# Altium PCB AD.PcbDoc
Units mm, origin at the board's own origin, x right, y up, seen from the top; angles counter-clockwise.
Board outline 75 x 75 mm, 2 copper layers (Top Layer, Bottom Layer); 9 components, 16 nets, 117 pads, 0 vias.
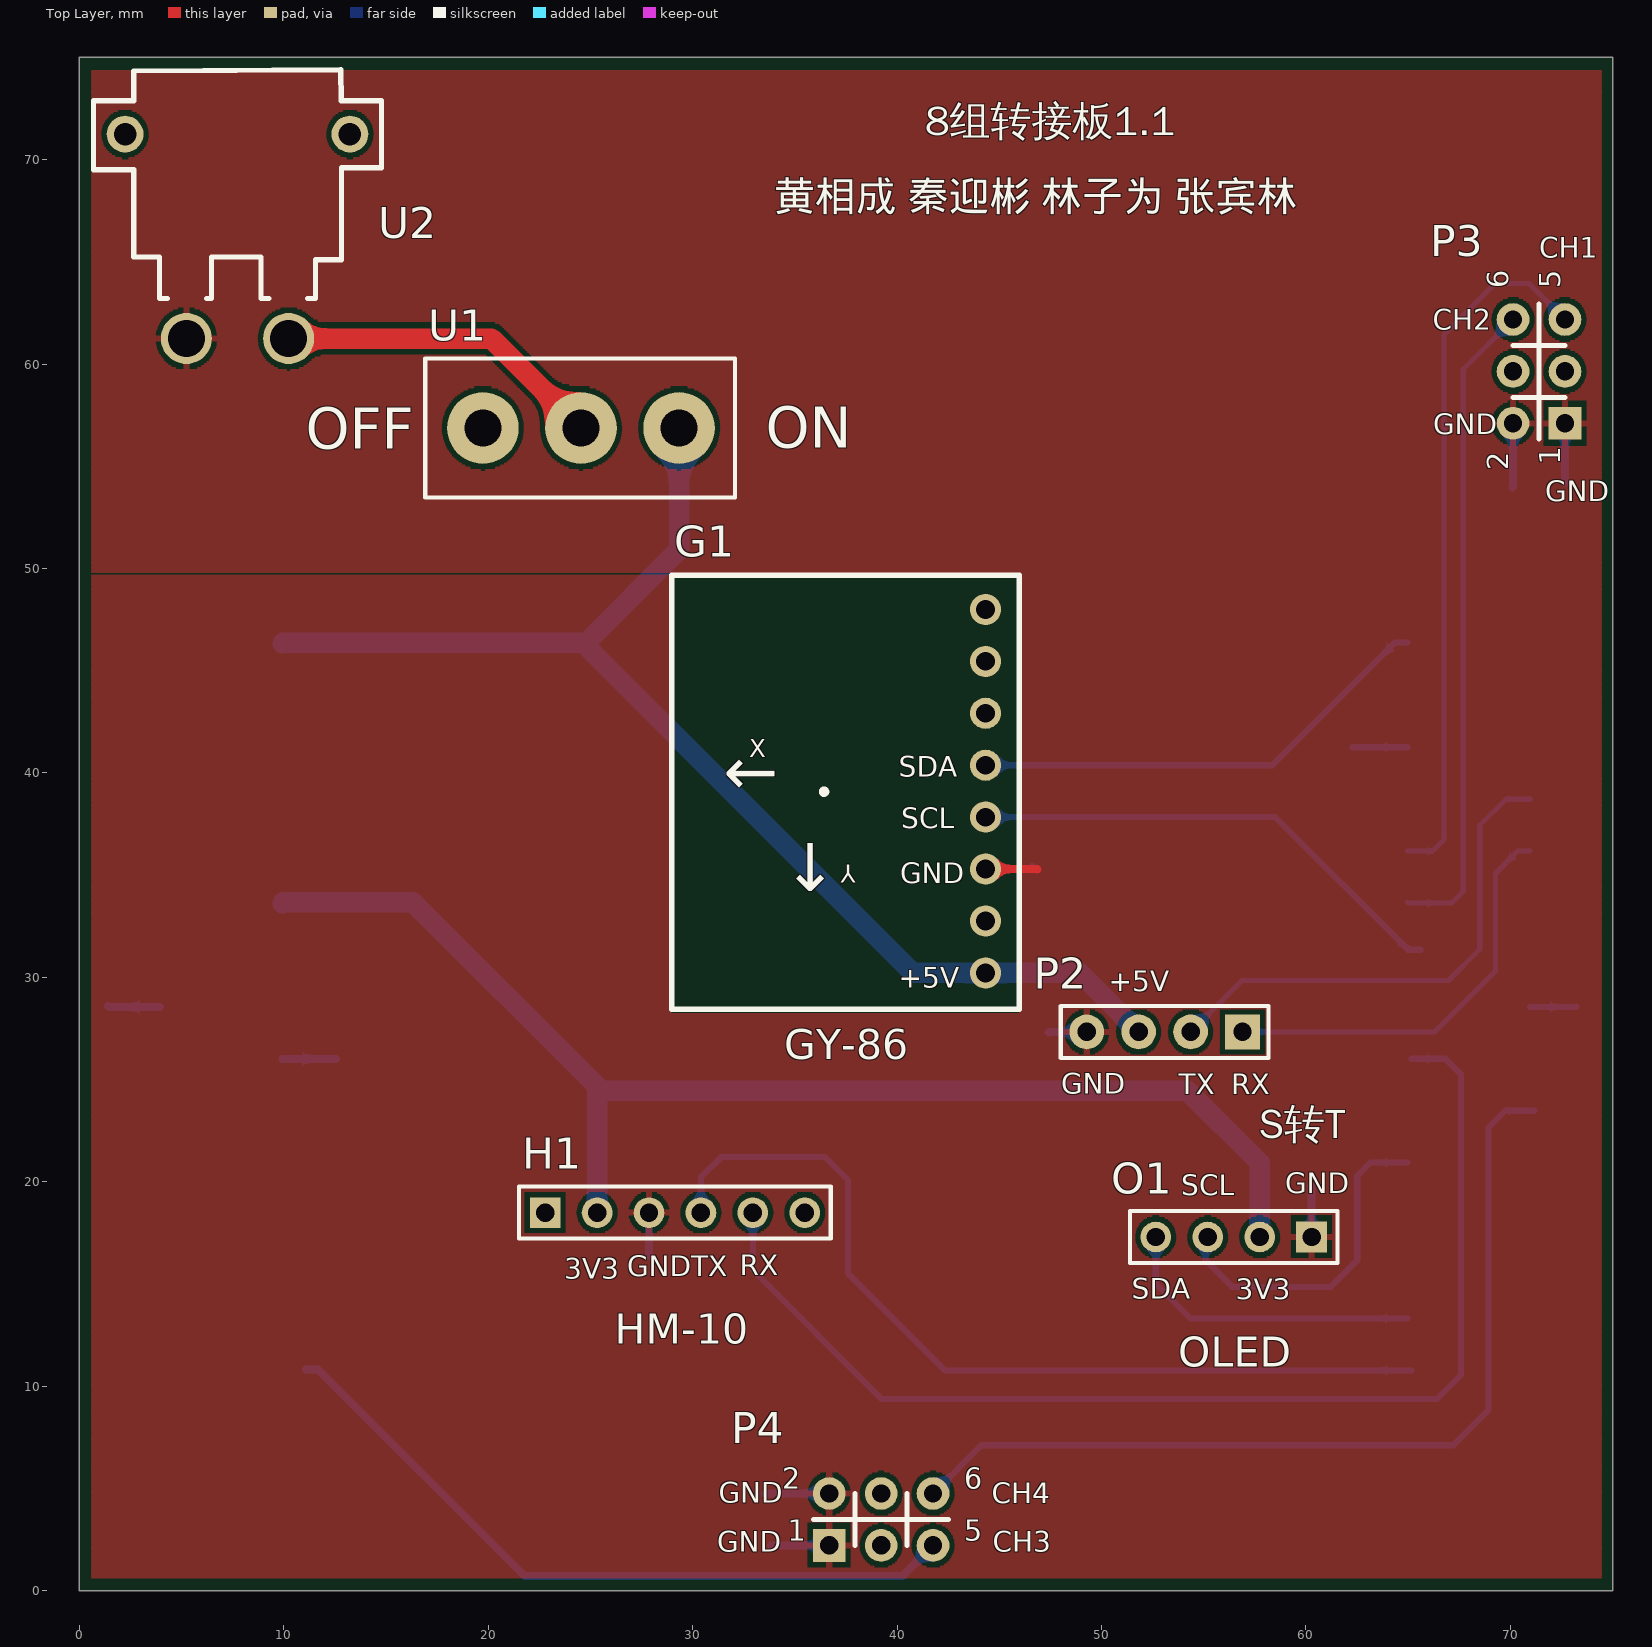
[diagram p0: Top Layer view]
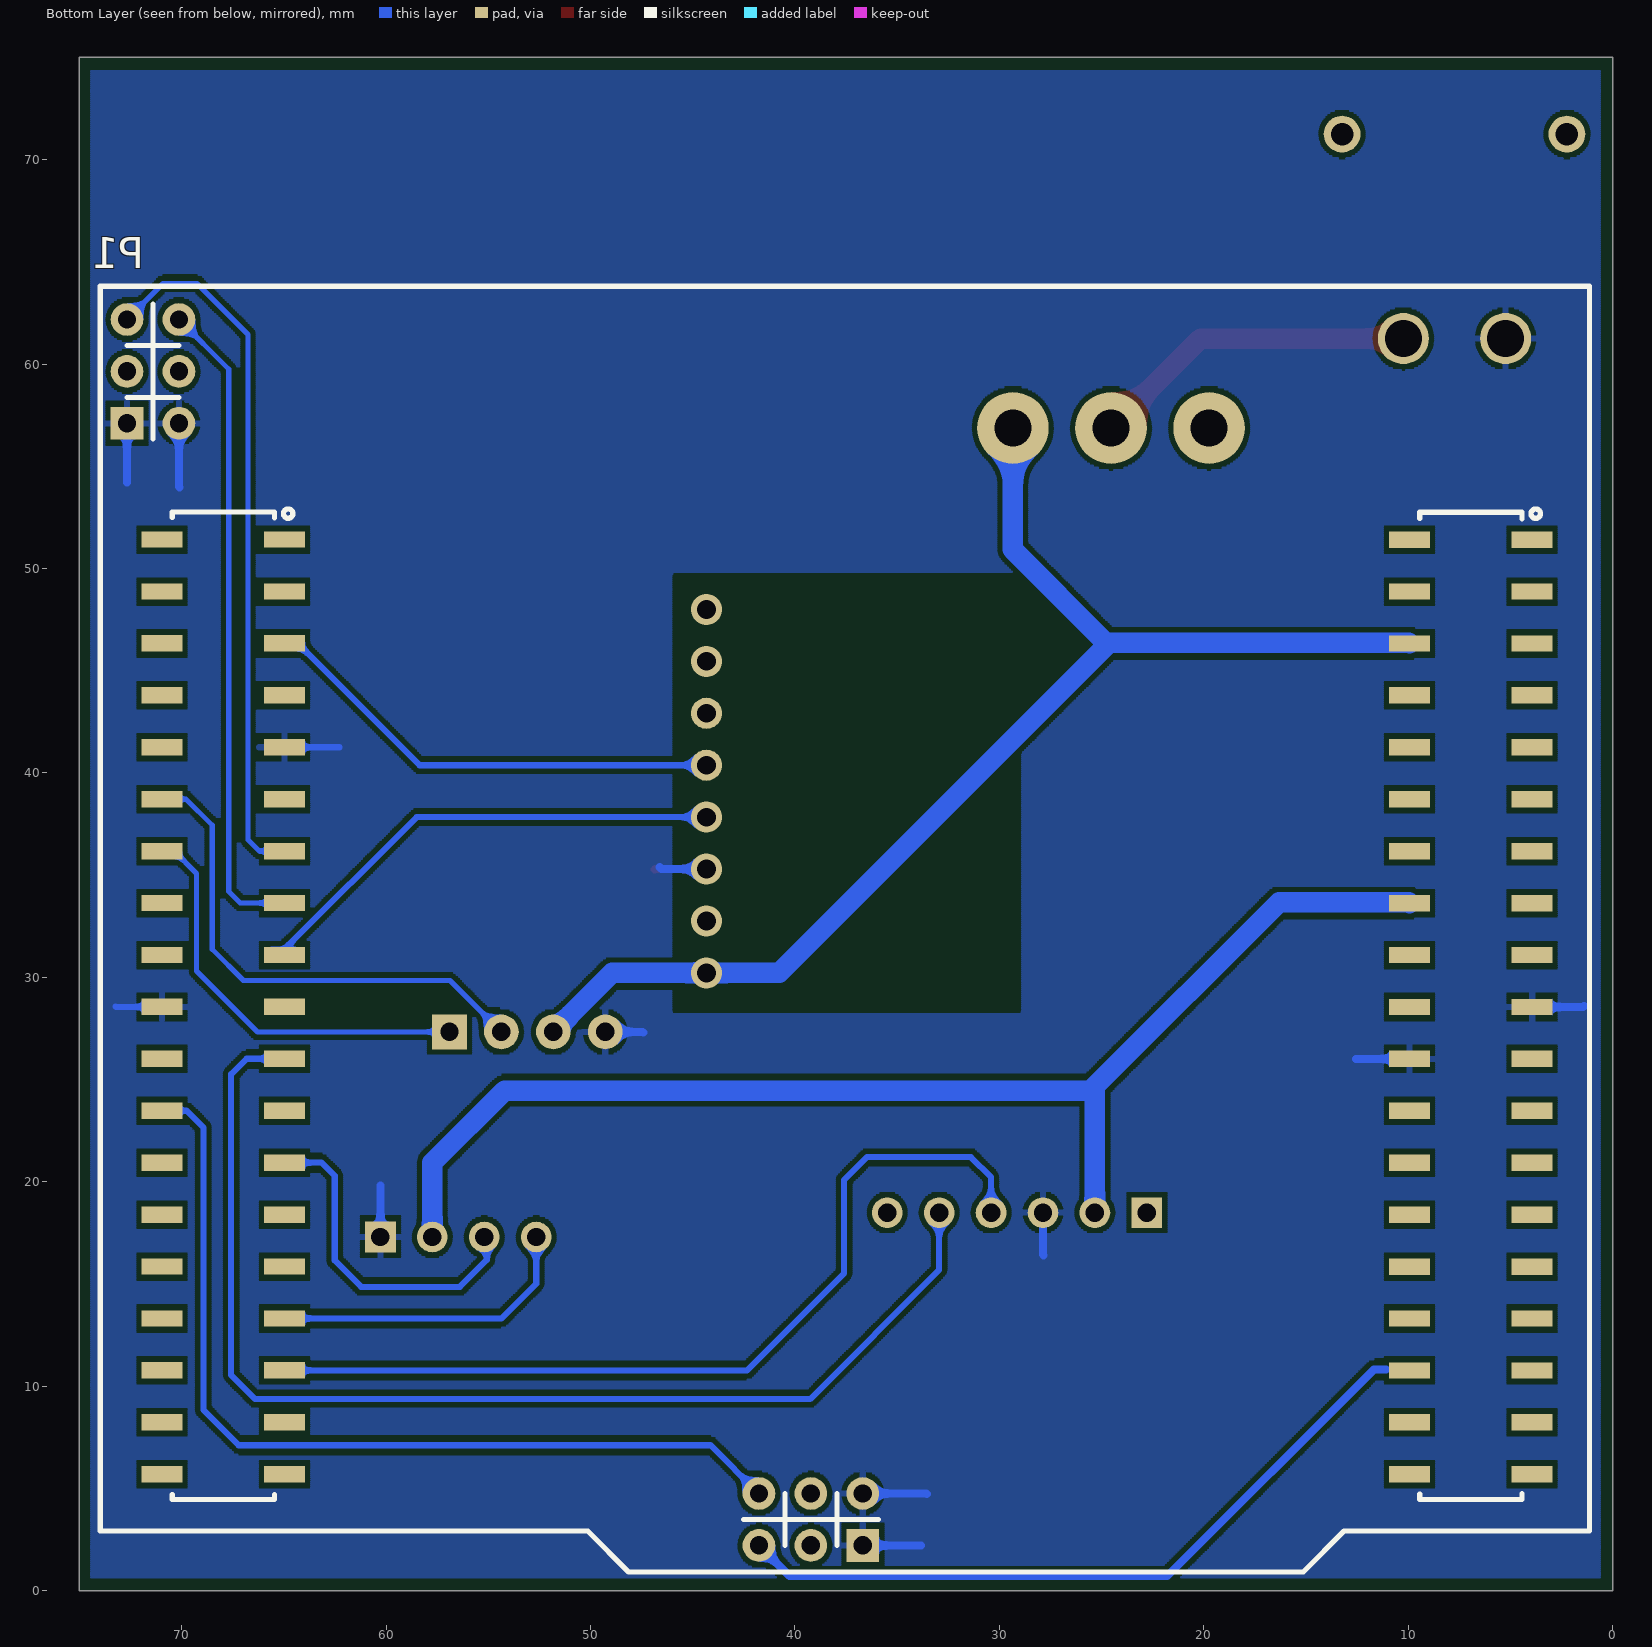
[diagram p1: Bottom Layer view, seen from below]

## Layer stack, top to bottom
Top Solder: solder mask 0.0102, Solder Resist, Dk 3.5
Top Layer: signal copper 0.0356
Dielectric 1: dielectric 0.32, FR-4, Dk 4.8
Bottom Layer: signal copper 0.0356
Bottom Solder: solder mask 0.0102, Solder Resist, Dk 3.5

## Board outline
0,0 0,75 75,75 75,0

## Design rules (kind name [scope] priority, off if disabled: settings)
Clearance GND_Polygon_Clearance [InNet('GND')] p1: gap=0.25 ignorepadtopadclearanceinfootprint=FALSE
Clearance [All] p2: gap=0.3 ignorepadtopadclearanceinfootprint=FALSE
PolygonConnect PolygonGND [InNet('GND')] p1: connectstyle=Relief reliefconductorwidth=0.3 reliefentries=4 polygonreliefangle="90 Angle" airgapwidth=0.25
PolygonConnect [All] p2: connectstyle=Relief reliefconductorwidth=0.254 reliefentries=4 polygonreliefangle="90 Angle" airgapwidth=0.254
RoutingVias [All] p1: holewidth=0.305 width=0.61 viastyle="Through Hole" minholewidth=0.305 minwidth=0.61 maxholewidth=0.305 maxwidth=0.61
SolderMaskExpansion [All] p1: expansion=0.064 istentingtop=FALSE
SupplyNets "Schematic Supply Nets_2" [InNet('+3V3')] p1: voltage=0.000
SupplyNets "Schematic Supply Nets_1" [InNet('+5')] p2: voltage=0.000
SupplyNets "Schematic Supply Nets" [InNet('GND')] p3: voltage=0.000
Width Width_PWR [InNetClass('PWR')] p1: maxlimit=1.524 minlimit=0.305 preferedwidth=0.305
Width Width_INF [InNetClass('INF')] p2: maxlimit=0.4 minlimit=0.2 preferedwidth=0.2
Width Width_PWM [InNetClass('PWM')] p3: maxlimit=0.4 minlimit=0.2 preferedwidth=0.2
Width [All] p4: maxlimit=0.254 minlimit=0.254 preferedwidth=0.254
30 further rules are at their usual default settings.

## Classes and differential pairs
net class PWM: TIM3_CH1 TIM3_CH2 TIM3_CH3 TIM3_CH4
net class INF: I2C1_SCL I2C1_SDA I2C2_SCL I2C2_SDA USART1_RX USART1_TX USART6_RX USART6_TX
net class PWR: +3V3 +5 GND NetU1_2

## Components (designator, comment, footprint, x,y, rotation, side; value= is the part's Value field where it differs from the comment)
G1 "GY-86" GY-86 39.247,39.105 r180 top
H1 "HM-10" HDR1X6 22.784,18.491 r0 top
O1 "OLED" HDR1X4 60.274,17.297 r180 top
P1 "NUCLEO-64" NUCLEO-F103RB 73.979,63.775 r270 bottom
P2 "SBUS转TTL" HDR2.54-M-LI-4P 53.086,27.33 r180 top
P3 "PWM" HDR2.54-WI-2X3P 71.399,59.639 r90 top
P4 "PWM" HDR2.54-WI-2X3P 39.218,3.48 r0 top
U1 "SS12D06-开关" SS12D06开关 24.536,56.871 r90 top
U2 "XT30PW" XT-30PW 10.235,61.247 r180 top

## Footprints (in the part's own frame and the unit in brackets; to place one, negate y for a bottom-side part, rotate by r counter-clockwise, add the part's x,y. Pads: shape width x height; smd on the part's side, far side on the other; paste and mask are expansions set on the pad)
GY-86 [mil]
  round 60 hole 36: 1(-200,350) 2(-200,250) 3(-200,150) 4(-200,50) 5(-200,-50) 6(-200,-150) 7(-200,-250) 8(-200,-350)
  silkscreen extent -265,-416 404,420
HDR1X4 [mm] "Connector; Header; 4 Position"
  rect 1.5x1.5 hole 0.9: 1(0,0)
  round 1.5 hole 0.9: 2(2.54,0) 3(5.08,0) 4(7.62,0)
  silkscreen extent -1.27,-1.27 8.89,1.27
HDR1X6 [mm] "Connector; Header; 6 Position"
  rect 1.5x1.5 hole 0.9: 1(0,0)
  round 1.5 hole 0.9: 2(2.54,0) 3(5.08,0) 4(7.62,0) 5(10.16,0) 6(12.7,0)
  silkscreen extent -1.27,-1.27 13.97,1.27, body extent -1.27,-1.27 13.97,1.27, height 8.5
HDR2.54-M-LI-4P [mm] "排母，4脚"
  rect 1.7x1.7 hole 0.9: 1(-3.81,0)
  round 1.7 hole 0.9: 2(-1.27,0) 3(1.27,0) 4(3.81,0)
  silkscreen extent -5.08,-1.27 5.08,1.27, body extent -5.08,-1.27 5.08,1.27, height 8.5
HDR2.54-WI-2X3P [mm] "双排弯脚排针，3x2脚"
  rect 1.6x1.6 hole 0.9: 1(-2.54,-1.27)
  round 1.6 hole 0.9: 2(-2.54,1.27) 3(0,-1.27) 4(0,1.27) 5(2.54,-1.27) 6(2.54,1.27)
  silkscreen extent -3.3,-1.27 3.3,1.27, body extent -3.81,-10.49 3.81,2.36, height 5.1
NUCLEO-F103RB [mm]
  rect 0.8x2 smd paste+0 mask+0.051: 1(12.366,70.045) 2(12.366,64.045) 3(14.906,70.045) 4(14.906,64.045) 5(17.446,70.045) 6(17.446,64.045) 7(19.986,70.045) 8(19.986,64.045) 9(22.526,70.045) 10(22.526,64.045) 11(25.066,70.045) 12(25.066,64.045) 13(27.606,70.045) 14(27.606,64.045) 15(30.146,70.045) 16(30.146,64.045) 17(32.686,70.045) 18(32.686,64.045) 19(35.226,70.045) 20(35.226,64.045) 21(37.766,70.045) 22(37.766,64.045) 23(40.306,70.045) 24(40.306,64.045) 25(42.846,70.045) 26(42.846,64.045) 27(45.386,70.045) 28(45.386,64.045) 29(47.926,70.045) 30(47.926,64.045) 31(50.466,70.045) 32(50.466,64.045) 33(53.006,70.045) 34(53.006,64.045) 35(55.546,70.045) 36(55.546,64.045) 37(58.086,70.045) 38(58.086,64.045) 73(12.361,9.019) 74(12.361,3.019) 75(14.901,9.019) 76(14.901,3.019) 77(17.441,9.019) 78(17.441,3.019) 79(19.981,9.019) 80(19.981,3.019) 81(22.521,9.019) 82(22.521,3.019) 83(25.061,9.019) 84(25.061,3.019) 85(27.601,9.019) 86(27.601,3.019) 87(30.141,9.019) 88(30.141,3.019) 89(32.681,9.019) 90(32.681,3.019) 91(35.221,9.019) 92(35.221,3.019) 93(37.761,9.019) 94(37.761,3.019) 95(40.301,9.019) 96(40.301,3.019) 97(42.841,9.019) 98(42.841,3.019) 99(45.381,9.019) 100(45.381,3.019) 101(47.921,9.019) 102(47.921,3.019) 103(50.461,9.019) 104(50.461,3.019) 105(53.001,9.019) 106(53.001,3.019) 107(55.541,9.019) 108(55.541,3.019) 109(58.081,9.019) 110(58.081,3.019)
  silkscreen extent -0.03,0 62.87,72.84
SS12D06开关 [mm]
  round 3.5 hole 1.8 paste-2539.97 mask+0.102: 1(0,4.8) 2(0,0) 3(0,-4.8)
  silkscreen extent -3.4,-7.54 3.4,7.62
XT-30PW [mm]
  round 2.5 hole 1.8 paste-2539.97 mask+0.051: 1(5,0) 2(0,0)
  round 1.8 hole 1.1 paste-2539.97 mask+0.051: 3(8,-10) 4(-3,-10)
  silkscreen extent -4.55,-13.15 9.55,-1.95

## Part data
G1: "GY-86模块", AddInBom=yes, Device=GY-86, FootprintName=GY-86, Symbol=GY-86
H1: "HM-10蓝牙模块", LatestRevisionDate=17-Jul-2002, LatestRevisionNote="Re-released for DXP Platform.", Publisher="Altium Limited"
O1: "使用I2C通信的0.96寸OLED模块", LatestRevisionDate=17-Jul-2002, LatestRevisionNote="Re-released for DXP Platform.", Publisher="Altium Limited"
P1: "STM32F401NUCLEO开发板", Manufacturer=ST, AddInBom=yes, Device=NUCLEO-64, FootprintName=NUCLEO-F103RB, Supplier=Mouser, SupplierPart=NUCLEO-F103rb, Symbol=NUCLEO-64
P2: "SBUS转TTL模块", LatestRevisionDate=17-Jul-2002, LatestRevisionNote="Re-released for DXP Platform.", Publisher="Altium Limited"
P3 P4: "电机PWM输出", LatestRevisionDate=17-Jul-2002, LatestRevisionNote="Re-released for DXP Platform.", Publisher="Altium Limited"
U1: library part SS12D06, "SS12D06开关", AddInBom=yes, Device=SS12D06-开关, FootprintName=SS12D06开关, OriginFootprint=SS12D06开关, Symbol=SS12D06-开关
U2: "XT-30插头", AddInBom=yes, Device=XT30PW, FootprintName=XT-30PW, OriginFootprint=XT-30PW, Symbol=XT30PW

## Nets (pads, with @x,y where several pads share a name; then routed paths per layer and width w, separated by ;. In a path a pad name is that pad's centre, name@x,y a point inside that pad or via, vN(x,y) a via of type N, cw(c..) or ccw(c..) an arc to the next point about the centre after c; other vN are vias at no path point)
+3V3: H1.2 O1.2 P1.16 | length 62.9
  Bottom Layer w1: P1.16 9.98,33.676 16.312,33.676 25.324,24.663 ; H1.2 25.324,24.663 ; O1.2 57.734,20.93 54.204,24.46 25.527,24.46 25.324,24.663
+5: G1.1 P1.6 P2.3 U1.3 | length 62.2
  Bottom Layer w1: P1.6 9.98,46.376 24.786,46.376 29.336,50.926 U1.3 ; 24.697,46.287 40.768,30.215 G1.1 48.931,30.215 P2.3
GND: G1.3 H1.3 O1.1 P1.19 P1.22 P1.81 P1.92 P2.4 P3.1 P3.2 P4.1 P4.2 U2.1 | length 33.5
  Top Layer w0.4: G1.3 46.848,35.295 46.863,35.281
  Bottom Layer w0.305: 62.281,41.25 62.286,41.254 P1.81 ; P1.92 73.208,28.554 73.228,28.575
  Bottom Layer w0.4: 1.397,28.6 1.448,28.55 P1.19 ; P1.22 12.548,26.01 ; 27.838,16.408 27.864,16.434 H1.3 ; 33.553,4.724 33.579,4.75 P4.2 ; 33.833,2.21 P4.1 ; G1.3 46.522,35.295 46.609,35.382 ; 47.422,27.305 47.447,27.33 P2.4 ; O1.1 60.274,19.812 ; 70.104,53.975 70.129,54 P3.2 ; 72.669,54.204 P3.1
I2C1_SCL: G1.4 P1.89 | length 24
  Bottom Layer w0.3: G1.4 58.509,37.835 64.996,31.348 P1.89@65.595,31.348
I2C1_SDA: G1.5 P1.77 | length 23.1
  Bottom Layer w0.3: G1.5 58.362,40.375 64.367,46.38 P1.77@64.968,46.38
I2C2_SCL: O1.3 P1.97 | length 16.6
  Bottom Layer w0.3: O1.3 55.067,17.17 55.067,16.18 56.388,14.859 61.214,14.859 62.509,16.154 62.509,20.295 63.149,20.935 P1.97
I2C2_SDA: O1.4 P1.103 | length 15.3
  Bottom Layer w0.3: O1.4 52.654,15.011 54.351,13.314 P1.103
NetU1_2: U1.2 U2.2 | length 16.1
  Top Layer w1: U2.2 20.16,61.247 U1.2
TIM3_CH1: P1.85 P3.5 | length 34.4
  Bottom Layer w0.254: P1.85 66.197,36.174 66.751,36.728 66.751,61.443 69.24,63.932 70.917,63.932 P3.5
TIM3_CH2: P1.87 P3.6 | length 32
  Bottom Layer w0.254: P1.87@64.968,33.68 65.013,33.634 67.127,33.634 67.691,34.198 67.691,59.741 P3.6
TIM3_CH3: P1.34 P4.5 | length 35.5
  Bottom Layer w0.4: 11.081,10.816 11.681,10.816 21.786,0.711 40.259,0.711 P4.5
TIM3_CH4: P1.96 P4.6 | length 45.3
  Bottom Layer w0.3: P4.6 44.12,7.112 67.208,7.112 68.936,8.839 68.936,22.657 69.753,23.474 P1.96 P1.96@71.169,23.474
USART1_RX: H1.4 P1.105 | length 43.9
  Bottom Layer w0.3: H1.4 30.404,20.218 31.394,21.209 36.474,21.209 37.592,20.091 37.592,15.519 42.337,10.775 P1.105@65.169,10.775
USART1_TX: H1.5 P1.93 | length 58
  Bottom Layer w0.3: H1.5 32.944,15.687 39.258,9.373 66.401,9.373 67.575,10.546 67.575,25.262 66.823,26.014 P1.93@65.169,26.014
USART6_RX: P1.84 P2.2 | length 24.9
  Bottom Layer w0.254: P2.2 56.871,29.845 66.98,29.845 68.504,31.369 68.504,37.44 69.779,38.714 P1.84 P1.84@70.968,38.714
USART6_TX: P1.86 P2.1 | length 20.5
  Bottom Layer w0.254: P2.1 66.294,27.33 69.266,30.302 69.266,35.08 70.36,36.174 P1.86
pads on no net: G1.2 G1.6 G1.7 G1.8 H1.1 H1.6 P1.1 P1.2 P1.3 P1.4 P1.5 P1.7 P1.8 P1.9 P1.10 P1.11 P1.12 P1.13 P1.14 P1.15 P1.17 P1.18 P1.20 P1.21 P1.23 P1.24 P1.25 P1.26 P1.27 P1.28 P1.29 P1.30 P1.31 P1.32 P1.33 P1.35 P1.36 P1.37 P1.38 P1.73 P1.74 P1.75 P1.76 P1.78 P1.79 P1.80 P1.82 P1.83 P1.88 P1.90 P1.91 P1.94 P1.95 P1.98 P1.99 P1.100 P1.101 P1.102 P1.104 P1.106 P1.107 P1.108 P1.109 P1.110 P3.3 P3.4 P4.3 P4.4 U1.1 U2.3 U2.4

## Polygon pours and split planes (outlines as drawn)
GND on Top Layer "GND_L01_P002" (hatched Horizontal grid 0.102 track 0.127, remove dead copper, pour order 2): 0.635,74.422 74.422,74.422 74.422,0.635 0.635,0.635
GND on Bottom Layer "GND_L02_P000" (hatched Horizontal grid 0.102 track 0.127, remove dead copper, pour order 0): 0.635,74.422 74.422,74.422 74.422,0.635 0.635,0.635

## Other copper
Top Layer:
  pour cut-out: 28.956,49.657 45.949,49.657 45.974,49.682 45.974,28.346 28.956,28.346 28.956,49.682
Bottom Layer:
  pour cut-out: 28.956,49.682 45.949,49.682 45.974,49.657 45.974,28.346 28.956,28.346

## Silkscreen, mask and mechanical layers (free items; w line width, h text height)
Top Overlay:
  text "8组转接板1.1" at 41.377,70.695 h2.5
  text "黄相成 秦迎彬 林子为 张宾林" at 33.985,67.003 h2.5
  text "CH1" at 71.399,65.202 h1
  text "CH2" at 66.192,61.671 h1
  text "GND" at 66.218,56.566 h1
  text "ON" at 33.579,55.905 h2
  text "OFF" at 11.074,55.855 h2
  text "GND" at 71.704,53.289 h1
  text "SDA" at 40.081,39.802 h1
  text "SCL" at 40.208,37.287 h1
  text "GND" at 40.157,34.595 h1
  text "+5V" at 40.081,29.489 h1
  text "+5V" at 50.343,29.312 h1
  text "GY-86" at 34.468,25.502 h2.5
  text "GND" at 48.031,24.308 h1
  text "TX" at 53.772,24.282 h1
  text "RX" at 56.337,24.282 h1
  text "S转T" at 57.683,21.631 h2.5
  text "GND" at 58.979,19.431 h1
  text "SCL" at 53.899,19.329 h1
  text "RX" at 32.309,15.418 h1
  text "GND" at 26.797,15.367 h1
  text "TX" at 29.921,15.367 h1
  text "3V3" at 23.724,15.265 h1
  text "SDA" at 51.486,14.275 h1
  text "3V3" at 56.566,14.249 h1
  text "HM-10" at 26.187,11.584 h2.5
  text "OLED" at 53.746,10.466 h2.5
  text "GND" at 31.267,4.293 h1
  text "CH4" at 44.628,4.267 h1
  text "GND" at 31.191,1.908 h1
  text "CH3" at 44.679,1.908 h1
Mechanical 1:
  lines w0.254: 75,0 75,75 0,75 0,0 75,0 ; 75,0 75,0

## Dimensions
0,0 to 0,75 on Top Overlay
0,0 to 75,0 on Top Overlay

## Text inside footprints (layer, text, board x,y; h text height)
G1: Top Overlay "↑" at 34.801,38.603 h4 r90; Top Overlay "X" at 32.769,40.477 h1.5; Top Overlay "↑" at 37.087,37.333 h4 r180; Top Overlay "Y" at 37.976,35.809 h1.5 r180
P3: Top Overlay "1" at 72.436,55.067 h1.02 r90; Top Overlay "2" at 69.896,54.813 h1.02 r90; Top Overlay "5" at 72.436,63.703 h1.02 r90; Top Overlay "6" at 69.896,63.703 h1.02 r90
P4: Top Overlay "6" at 43.282,4.983 h1.02; Top Overlay "5" at 43.282,2.443 h1.02; Top Overlay "2" at 34.392,4.983 h1.02; Top Overlay "1" at 34.646,2.443 h1.02